# Altium PCB asar_feather.PcbDoc (part 3 of 4)
Units mm, origin at the board's own origin, x right, y up, seen from the top; angles counter-clockwise.
Board outline 50.8 x 22.86 mm, 6 copper layers (Top Layer, L2-GND, L3-SIG, L4-SIG, L5-VCC3V3, Bottom Layer), stack 1.568 mm thick; 174 components, 154 nets, 827 pads, 1521 vias.
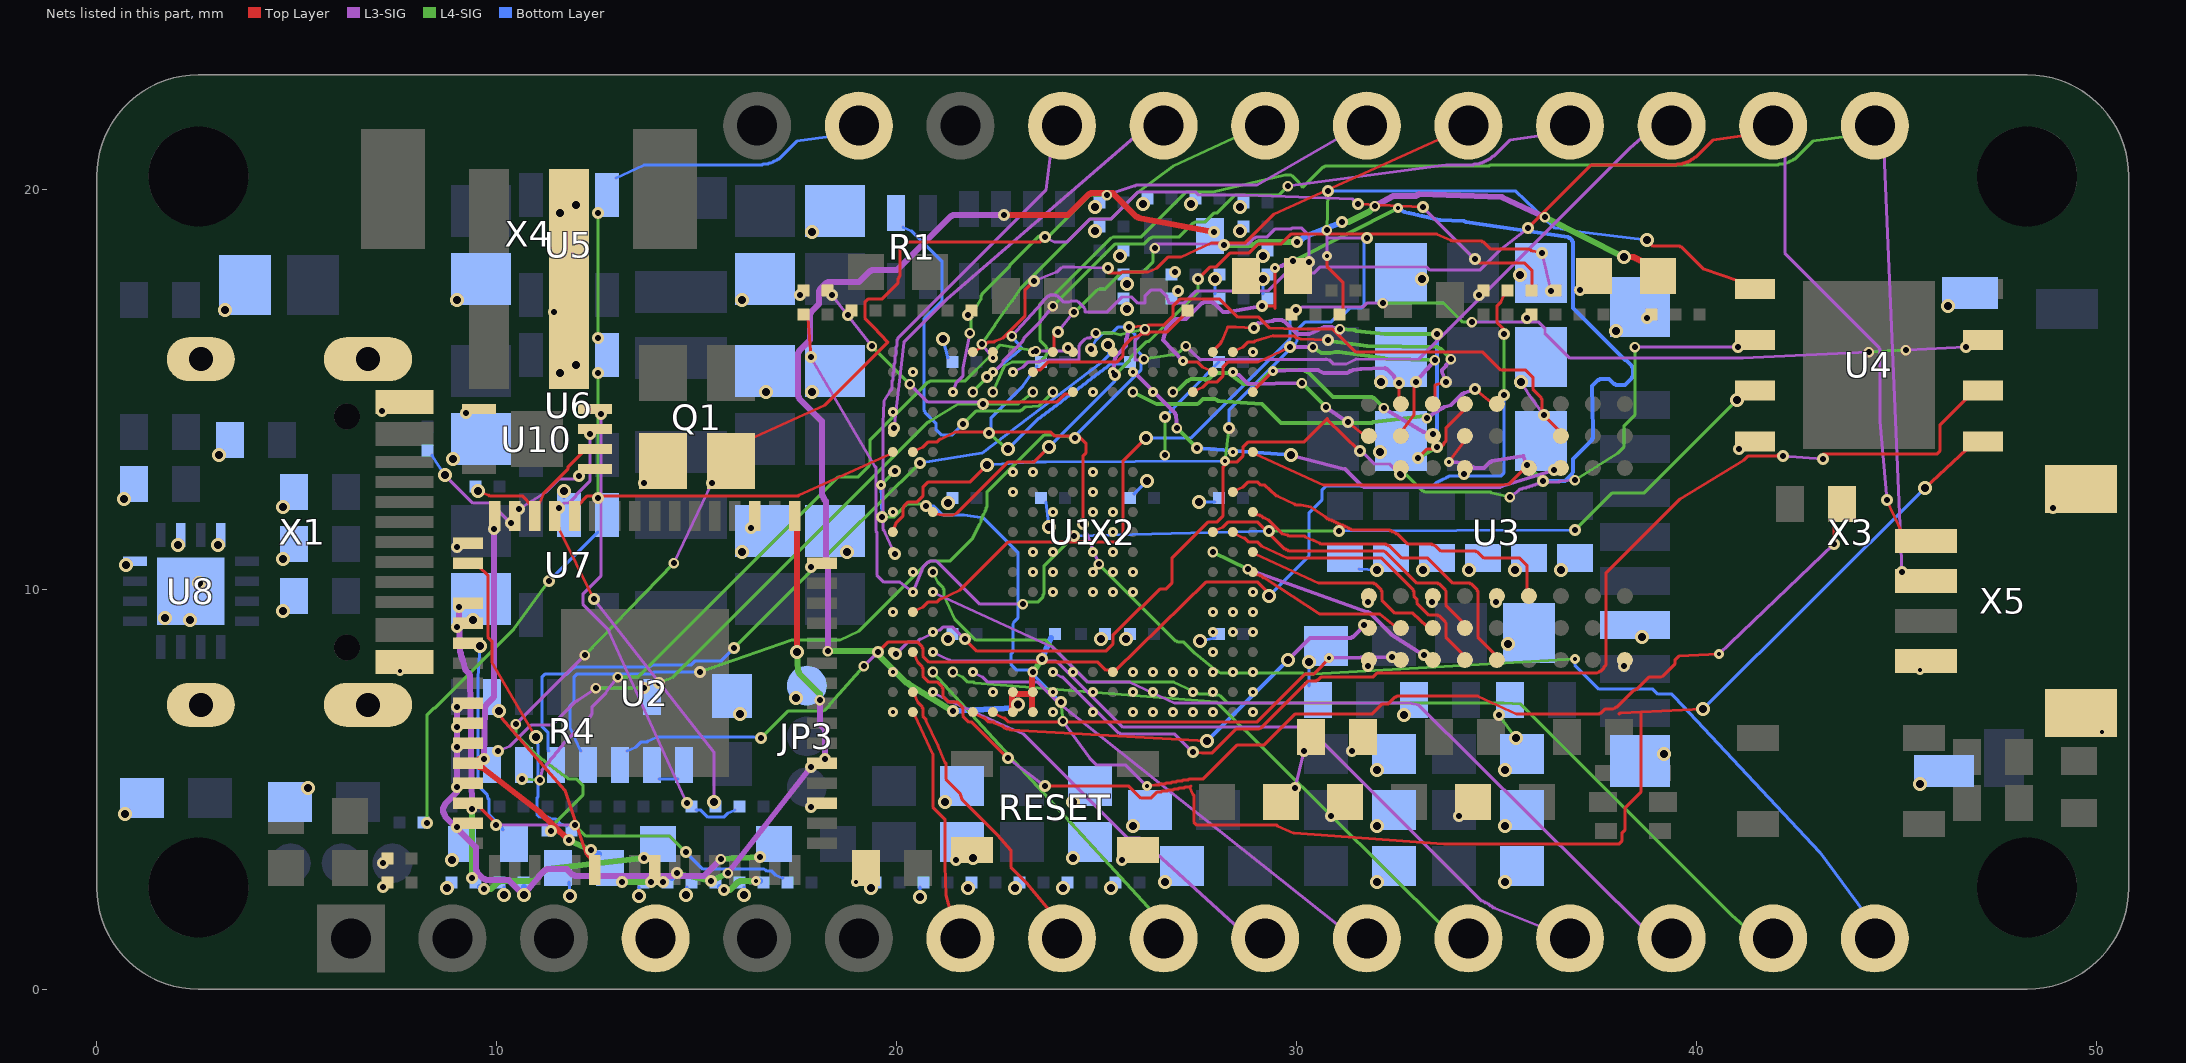
[diagram p6: the nets of this part, all layers, seen from the top]

## Via types
v1: diameter 0.27, hole 0.15, L3-SIG to L4-SIG, tented both sides, 233 vias
v2: diameter 0.3, hole 0.15, L5-VCC3V3 to Bottom Layer, tented both sides, 219 vias
v3: diameter 0.3, hole 0.15, Top Layer to L2-GND, tented both sides, 208 vias
v4: diameter 0.25, hole 0.1, Top Layer to L2-GND, tented both sides, 175 vias
v5: diameter 0.3, hole 0.15, L2-GND to L3-SIG, tented both sides, 171 vias
v6: diameter 0.3, hole 0.15, L4-SIG to L5-VCC3V3, tented both sides, 171 vias
v7: diameter 0.35, hole 0.2, Top Layer to Bottom Layer, tented both sides, 165 vias
v8: diameter 0.25, hole 0.1, L2-GND to L3-SIG, tented both sides, 106 vias
v9: diameter 0.25, hole 0.1, L4-SIG to L5-VCC3V3, tented both sides, 49 vias
v10: diameter 0.25, hole 0.1, L5-VCC3V3 to Bottom Layer, tented both sides, 24 vias

## Nets (pads, with @x,y where several pads share a name; then routed paths per layer and width w, separated by ;. In a path a pad name is that pad's centre, name@x,y a point inside that pad or via, vN(x,y) a via of type N, cw(c..) or ccw(c..) an arc to the next point about the centre after c; other vN are vias at no path point) (continued)
BS0: U1.V7 U3.G7 | length 11.8
  Top Layer w0.076: v3(36.425,12.975) U3.G7@36.45,12.975
  L3-SIG w0.1: v8@25.9,15.425 25.975,15.375 26.95,14.4 26.95,14.375 26.975,14.35 v1(27,14.025) ; v7(29.85,13.35) 31.2,13 31.625,12.575 31.65,12.575 31.675,12.55 35.075,12.55 35.1,12.575 35.125,12.575 v3(36.425,12.975)
  L4-SIG w0.1: v1(27,14.025) v6(27.5,13.525)
  Bottom Layer w0.1: v6(27.5,13.525) v7(29.85,13.35)
  other v2: 27.5,13.525
  other v4: 25.9,15.43
  other v5: 36.425,12.975
  other v8: 25.9,15.43
BS1: U1.V8 U3.G8 | length 14.2
  Top Layer w0.076: v3(25.8,16.55) 26.225,16.575 26.25,16.575 26.275,16.6 26.675,16.6 ; 26.67,16.595 26.9,16.825 26.9,17.075 27.075,17.25 28.075,17.25 28.525,16.8 29.05,16.8 29.325,16.525 30.025,16.5 30.9,16.5 31.475,15.925 34.65,15.925 35.1,15.475 35.725,15.475 35.9,15.3 35.9,15 36.1,14.8 36.1,14.775 36.125,14.75 36.125,14.4 U3.G8@36.55,13.975
  L3-SIG w0.1: v8@25.4,15.425 25.45,15.775 25.475,15.8 25.475,15.825 25.725,16.075 25.725,16.25 25.75,16.275 25.75,16.3 v3(25.8,16.55)
  other v4: 25.4,15.43
  other v5: 25.8,16.55
  other v8: 25.4,15.43
BTN: R85.2 U1.N19 | length 33.8
  Top Layer w0.076: v4(26.25,5.075) 26.45,5.1 26.55,5.1 26.575,5.125 26.7,5.125 26.725,5.15 26.85,5.15 26.875,5.175 26.975,5.175 27,5.2 27.125,5.2 27.15,5.225 27.275,5.225 27.3,5.25 27.65,5.25 28.5,6.1 29.175,6.1 29.95,6.875 31.875,6.875 32.125,7.125 32.275,7.125 32.45,7.3 32.475,7.3 32.5,7.325 34.525,7.325 35.5,6.875 37.55,6.875 37.575,6.9 37.6,6.9 37.7,7 37.9,7 37.95,7.025 37.975,7.05 38,7.05 38.425,7.475 38.45,7.475 38.475,7.5 38.5,7.5 38.8,7.8 39.1,7.8 39.15,7.825 39.45,8.125 39.45,8.225 39.55,8.325 v4(40.55,8.375) ; v3(43.425,11.125) R85.2@43.425,11.775
  L3-SIG w0.076: v1(24.15,6.7) 24.825,5.775 25,5.6 25.725,5.6 v4(26.25,5.075) ; v4(40.55,8.375) v3(43.425,11.125)
  L4-SIG w0.076: v9(19.6,12.6) v3(19.95,12.95) ; v6(19.625,11.8) 19.925,11.8 20.25,12.125 20.675,12.125 v6(20.725,12.075) ; v6(24.1,7.175) v1(24.15,6.7)
  Bottom Layer w0.076: v9(19.6,12.6) v6(19.625,11.8) ; v6(20.725,12.075) 20.925,12.075 21.15,11.85 21.675,11.85 22.175,11.775 23.025,10.925 23.025,9.275 22.925,9.175 22.9,9.125 22.9,8.425 22.85,8.375 22.85,8.125 23,7.975 23.3,7.975 v6(24.1,7.175)
  other v1: 19.95,12.95
  other v2: 24.1,7.175 19.625,11.8 20.725,12.075
  other v5: 43.425,11.125 19.95,12.95
  other v8: 26.25,5.075 40.55,8.375
  other v10: 19.6,12.6
CAS#: U1.P1 U3.F7 | length 7
  Top Layer w0.076: U1.P1@28.975,13.375 30.675,12.6 35.1,12.6 35.3,12.625 U3.F7@35.65,12.975
CFG-M0: R20.1 U1.V12 | length 4.4
  Top Layer w0.076: U1.V12@23.475,15.475 23.575,15.475 23.775,15.675 25.5,15.675 25.65,15.825 25.65,16.025 25.675,16.05 25.675,16.075 25.875,16.275 26.075,16.35 26.1,16.375 26.275,16.375 26.325,16.425 26.75,16.425 27.15,16.825 R20.1@27.15,16.85
CFG-M1: R21.2 U1.W11 | length 8.8
  Top Layer w0.076: U1.W11@23.925,16.025 23.925,16.375 v3(24.025,16.425)
  L3-SIG w0.076: v3(24.025,16.425) v1(24.425,16.925) ; v1(26.45,18.525) 26.45,18.625 28.775,18.625 28.925,18.775 28.95,18.775 28.975,18.8 29.25,18.8 29.45,19 29.85,19 29.875,19.025 30.125,19.025 30.3,18.85 v3(30.3,18.175)
  L4-SIG w0.076: v1(24.425,16.925) v1@24.5,16.975 ; v1@24.51,16.985 25,17.475 25.05,17.5 25.2,17.5 25.625,17.925 26.15,17.925 26.4,18.175 26.4,18.475 v1(26.45,18.525)
  other v5: 24.025,16.425 30.3,18.175
CFG-M2: R22.2 U1.U10 | length 7.3
  Top Layer w0.076: v3(22.15,14.625) 22.2,14.675 24,14.675 24.2,14.875 U1.U10@24.325,14.875
  L3-SIG w0.076: v3(18.375,17.35) v1(19.375,16.075) ; v1(20.325,15.125) 20.775,14.675 22.1,14.675 v3(22.15,14.625)
  L4-SIG w0.076: v1(19.375,16.075) v1(20.325,15.125)
  other v5: 22.15,14.625 18.375,17.35
CHAN0: U1.A18 X2.7 | length 5.2
  Top Layer w0.076: U1.A18@20.45,6.85 20.9,5.875 20.9,4.55 21.2,4.25 21.2,3.1 21.225,2.35 X2.7@21.35,1.9
CHAN1: U1.B18 X2.8 | length 6.7
  Top Layer w0.076: U1.B18@20.45,7.35 20.525,7.175 20.625,7.075 20.625,7.05 20.65,7.025 20.65,6.825 20.725,6.75 20.725,6.725 21.025,6.1 21.2,5.675 21.225,5.65 21.225,5.25 21.575,4.9 21.625,4.75 22.525,3.85 22.85,3.475 22.85,3.05 23.25,2.65 X2.8@23.875,1.9
CHAN2: U1.C17 X2.9 | length 8.2
  L4-SIG w0.076: v1@20.9,7.925 X2.9@26.425,1.9
  other v1: 20.9,7.93
  other v4: 20.9,7.93
  other v8: 20.9,7.93
CHAN3: U1.B17 X2.10 | length 9.9
  L3-SIG w0.076: v8@20.9,7.425 21.175,7.275 21.2,7.275 21.3,7.175 21.425,7.175 21.45,7.15 23.175,6.375 25.775,3.775 26.075,3.775 X2.10@28.575,1.5
  other v4: 20.9,7.43
  other v8: 20.9,7.43
CHAN4: U1.C15 X2.11 | length 11.5
  L3-SIG w0.076: v8@21.9,7.925 22.15,7.8 22.275,7.675 23.525,7.675 24.05,7.15 X2.11@31.125,1.525
  other v4: 21.9,7.93
  other v8: 21.9,7.93
CHAN5: U1.C16 X2.12 | length 14.7
  L4-SIG w0.076: v1@21.4,7.925 21.65,7.8 21.775,7.675 21.925,7.675 21.95,7.65 28,7.175 X2.12@33.675,1.55
  other v1: 21.4,7.93
  other v4: 21.4,7.93
  other v8: 21.4,7.93
CHAN6: U1.D17 X2.13 | length 18
  L3-SIG w0.076: v8@20.9,8.425 21.325,8.225 21.35,8.2 23.975,8.2 24.025,8.175 25.65,6.55 30.275,6.55 34.625,2.2 34.65,2.2 34.7,2.175 34.725,2.15 34.75,2.15 34.8,2.125 34.85,2.075 34.875,2.075 34.925,2.025 34.95,2.025 X2.13@36.2,1.525
  other v4: 20.9,8.43
  other v8: 20.9,8.43
CHAN7: U1.G17 X2.14 | length 20.9
  L3-SIG w0.076: v8@20.9,9.925 23.9,8.55 24.775,7.675 25.825,7.675 26.95,7.15 32.8,7.15 33.05,7.1 X2.14@38.725,1.475
  other v4: 20.9,9.93
  other v8: 20.9,9.93
CHAN8: U1.H17 X2.15 | length 24.3
  L4-SIG w0.076: v1@20.9,10.425 21.025,10.175 21.15,10.05 21.15,10.025 21.175,10 21.175,9.85 21.45,9.25 21.975,8.725 23.725,8.725 24.775,7.675 26.925,7.675 27.525,7.4 27.55,7.375 27.8,7.375 27.825,7.35 28.05,7.35 28.1,7.325 28.275,7.15 35.175,7.15 35.6,7.125 40.875,1.85 X2.15@41.275,1.5
  other v1: 20.9,10.43
  other v4: 20.9,10.43
  other v8: 20.9,10.43
CHAN14: U1.J19 X2.20 | length 11.8
  L3-SIG w0.076: v3(19.95,10.875) 19.7,11.425 19.675,11.475 19.65,11.5 19.65,14.15 19.675,14.7 19.85,14.975 19.875,15 19.875,15.2 19.9,15.225 19.9,15.4 19.925,15.425 19.925,15.625 19.95,15.65 19.95,15.825 19.975,15.85 19.975,16.05 20,16.075 20,16.225 20.025,16.25 20.025,16.275 23.725,19.975 X2.20@23.85,20.975
  other v5: 19.95,10.875
CHAN15: U1.R19 X2.21 | length 10
  L3-SIG w0.076: v3(19.925,14.025) 20.175,16.175 21.25,17.25 X2.21@26.025,21.375
  other v5: 19.925,14.025
CHAN16: U1.W14 X2.22 | length 9.1
  Top Layer w0.076: v4(22.4,15.775) U1.W14@22.4,15.85
  L3-SIG w0.076: v1(22.125,16.125) v4(22.4,15.775)
  L4-SIG w0.076: v1(22.125,16.125) 22.455,16.598 ; 22.45,16.6 22.875,17.2 ; 22.869,17.194 23.1,17.525 24.825,19.25 25.35,19.25 26.025,19.925 26.9,20.575 X2.22@28.575,21.35
  other v8: 22.4,15.775
CHAN17: U1.U16 X2.23 | length 13.1
  L3-SIG w0.076: v8@21.4,14.925 21.475,15.15 21.65,15.325 21.65,15.525 v1(21.825,16.4) ; v1(25.25,19.85) 25.925,20.075 25.95,20.075 25.975,20.1 29,20.1 X2.23@31.125,21.325
  L4-SIG w0.076: v1(21.825,16.4) 21.85,16.425 21.85,16.775 21.875,16.8 21.875,16.825 21.903,16.853 ; 21.9,16.85 22,17.075 22.1,17.25 ; 22.1,17.246 22.1,17.325 22.125,17.35 22.125,17.375 22.825,18.075 22.825,18.1 23.55,18.825 23.575,18.825 23.6,18.85 23.825,18.85 24.825,19.85 v1(25.25,19.85)
  other v4: 21.4,14.93
  other v8: 21.4,14.93
CHAN18: U1.W15 X2.24 | length 13.9
  Top Layer w0.076: U1.W15@21.975,15.975 22.15,16.05 22.275,16.175 22.425,16.175 22.45,16.2 22.65,16.275 23.2,16.825 23.2,17.475 v3(23.425,17.7) ; v3(25.275,18.025) 25.275,17.9 25.6,17.9 25.625,17.925 26.275,17.925 26.5,18.025 26.775,18.3 27.1,18.3 27.85,18.65 28.7,18.65 29.425,19.375 X2.24@33.675,21.3
  L3-SIG w0.076: v3(23.425,17.7) 23.975,17.925 24,17.925 24.1,18.025 24.15,18.05 24.425,18.05 v3(25.275,18.025)
  other v5: 23.425,17.7 25.275,18.025
CHAN19: U1.V14 X2.25 | length 16.1
  L3-SIG w0.076: v8@22.4,15.425 22.475,15.475 22.625,15.625 22.65,15.675 22.65,15.7 23.15,16.2 23.15,16.225 23.175,16.25 23.175,16.275 23.575,16.675 v1(23.9,17.075) ; v1(29.775,20.075) 33.725,20.6 34.4,20.6 34.425,20.625 34.55,20.625 34.575,20.65 34.625,20.65 34.65,20.675 34.675,20.675 34.7,20.7 34.725,20.7 34.75,20.725 34.775,20.725 34.8,20.75 34.825,20.75 34.9,20.825 34.925,20.825 35.325,21.225 X2.25@36.2,21.35
  L4-SIG w0.076: v1(23.9,17.075) 25.45,18.625 26.175,18.625 26.325,18.775 26.35,18.775 26.375,18.8 27.05,18.8 27.4,19.15 27.425,19.15 27.45,19.175 27.7,19.175 27.925,19.4 28,19.4 28.45,19.85 29.55,19.85 v1(29.775,20.075)
  other v4: 22.4,15.43
  other v8: 22.4,15.43
CHAN20: U1.V13 X2.26 | length 20.2
  L3-SIG w0.076: v8@22.9,15.425 23.15,15.55 23.272,15.672 ; 23.275,15.675 23.55,15.675 23.575,15.7 23.6,15.7 23.8,15.725 ; 23.791,15.726 24.55,15.728 ; 24.55,15.725 24.55,16.075 24.575,16.1 24.575,16.125 24.7,16.25 24.75,16.275 24.801,16.275 24.825,16.275 24.85,16.3 v1(24.975,16.4) ; 25.95,15.725 25.95,16.206 ; 25.95,15.731 v1@26.106,15.732 ; 25.95,16.2 v1(26.2,16.5) ; v1@26.1,15.725 v1(26.175,15.75) ; v1(27.225,16.075) 27.6,15.725 ; 27.598,15.736 30.732,15.744 ; 30.725,15.75 30.8,15.725 30.825,15.725 30.925,15.625 31.225,15.625 31.475,15.75 ; 31.469,15.746 33.05,15.75 38.325,21.025 X2.26@38.725,21.375
  L4-SIG w0.076: v1(24.975,16.4) 25.4,16.4 25.6,16.35 ; 25.602,16.362 v1(26.2,16.5) ; v1(26.175,15.75) 27,15.875 v1(27.225,16.075)
  other v4: 22.9,15.43
  other v8: 22.9,15.43
CHAN21: U1.U15 X2.27 X5.4 | length 34.1
  Top Layer w0.076: v3(35.775,19.025) 37.35,20.6 39.475,20.6 39.5,20.625 39.625,20.625 39.65,20.65 39.7,20.65 39.725,20.675 39.775,20.675 39.8,20.7 39.825,20.7 39.875,20.75 39.9,20.75 39.95,20.8 39.975,20.8 40.4,21.225 X2.27@41.275,21.35 ; v3(44.75,12.225) X5.4@45.125,11.425
  L3-SIG w0.076: v1(22.875,16.325) 23.625,17.15 23.65,17.175 23.65,17.2 23.775,17.325 23.8,17.325 23.825,17.35 23.975,17.35 24,17.325 24.025,17.325 24.175,17.175 24.3,17.175 24.35,17.2 24.5,17.2 24.55,17.175 24.675,17.05 24.7,17 24.7,16.925 ; 24.699,16.925 25.25,16.925 25.625,17.3 25.875,17.3 26.025,17.15 26.188,17.15 ; 26.2,17.15 26.2,17.325 26.35,17.475 26.6,17.475 26.75,17.325 26.75,17.275 26.775,17.25 26.8,17.15 ; 26.812,17.15 27.175,17.15 27.475,17.45 29.275,17.45 29.725,17.9 30.425,17.9 30.575,18.05 33.25,18.05 33.325,17.975 34.575,17.975 35.1,18.5 v3(35.775,19.025) ; X2.27@42.2,20.975 42.2,18.4 44.55,16.05 44.55,16.025 44.575,16 44.575,14.2 v3(44.75,12.225)
  L4-SIG w0.076: v1@21.9,14.925 v6(22.25,15.3)
  Bottom Layer w0.076: v6(22.25,15.3) 23.129,16.021 ; v1(22.875,16.325) 23.125,16.025
  other v1: 21.9,14.93
  other v2: 22.25,15.3
  other v4: 21.9,14.93
  other v5: 44.75,12.225 35.775,19.025
  other v8: 21.9,14.93
  other v9: 22.875,16.325
  other v10: 22.875,16.325
CHAN22: U1.U14 X2.28 X5.3 | length 35.8
  L3-SIG w0.076: X2.28@44.675,20.95 v3(45.125,10.425)
  L4-SIG w0.076: v1@22.4,14.925 22.678,15.567 ; 22.675,15.575 22.875,15.675 23.55,15.675 23.575,15.7 23.6,15.7 23.725,15.825 23.725,15.85 23.75,15.875 23.75,16.025 23.725,16.05 23.725,16.075 23.575,16.225 23.575,17.125 23.775,17.325 23.8,17.325 23.825,17.35 23.925,17.35 25.35,18.775 25.4,18.8 26.1,18.8 27.225,19.925 27.9,19.925 29.7,20.35 29.85,20.35 29.9,20.325 30.025,20.2 30.15,20.05 30.65,20.55 30.675,20.55 30.7,20.575 34.8,20.575 34.825,20.6 42.025,20.6 42.05,20.625 42.175,20.625 42.2,20.65 42.25,20.65 42.3,20.675 42.325,20.7 42.35,20.7 42.4,20.725 42.425,20.75 42.45,20.75 42.9,21.2 X2.28@43.825,21.325
  other v1: 22.4,14.93
  other v4: 22.4,14.93
  other v5: 45.125,10.425
  other v8: 22.4,14.93
CHAN-CLK: U1.P18 X2.16 | length 30.8
  Top Layer w0.076: U1.P18@20.475,13.475 20.65,13.55 20.775,13.675 21,13.675 21.075,13.75 21.1,13.75 21.45,13.925 23.85,13.925 23.95,13.825 24.55,13.825 24.725,13.65 24.725,13.4 24.65,13.325 v3(24.65,11.625)
  L3-SIG w0.076: v3(24.65,11.625) v1(25.05,10.625)
  L4-SIG w0.076: v1(25.05,10.625) 26.975,8.7 27,8.7 27.025,8.675 27.175,8.675 27.45,8.4 28,7.95 28.025,7.95 28.05,7.925 28.1,7.9 30.15,7.9 30.175,7.875 30.425,7.875 v9(36.95,8.25)
  Bottom Layer w0.076: v9(36.95,8.25) 36.95,8.1 37.55,7.5 38.9,7.5 39.025,7.375 39.375,7.375 39.45,7.3 43.075,3.425 X2.16@44.2,1.9
  other v5: 24.65,11.625
  other v10: 36.95,8.25
CKE: U1.M2 U3.F3 | length 8.7
  Top Layer w0.076: U1.M2@28.475,12.475 28.65,12.55 28.775,12.675 29.025,12.675 29.1,12.6 29.2,12.6 29.475,12.35 29.5,12.325 29.525,12.325 29.95,12.125 29.975,12.1 30.1,12.1 30.35,12.05 30.725,11.8 ; 30.72,11.79 30.75,11.775 30.775,11.75 30.8,11.75 30.825,11.725 30.875,11.725 30.9,11.7 30.925,11.7 30.95,11.675 30.975,11.675 31,11.65 31.025,11.65 31.05,11.625 31.075,11.625 31.1,11.6 31.15,11.6 31.2,11.575 31.225,11.55 31.25,11.55 31.3,11.525 31.325,11.5 31.35,11.5 31.375,11.475 32.325,11.475 32.35,11.45 32.375,11.45 32.4,11.425 32.425,11.425 32.475,11.4 32.5,11.375 32.525,11.375 32.775,11.125 33.375,11.125 33.4,11.1 33.425,11.1 33.475,11.075 33.6,10.95 34.475,10.95 34.5,10.925 34.525,10.925 34.675,10.775 35.575,10.775 35.75,10.6 U3.F3@35.75,9.975
CLK-12M-FPGA: R25.2 U1.L17 | length 19.5
  Top Layer w0.076: U1.L17@20.975,11.875 21.15,11.85 21.4,11.85 21.5,11.9 22.775,13.175 23.425,13.175 v7(23.8,13.55) ; v1(27.525,17.75) 27.825,18.05 27.975,18.05 28.325,18.4 28.8,18.4 29.025,18.625 29.6,18.625 29.85,18.875 33.5,18.875 33.85,18.725 33.875,18.7 34.625,18.7 34.65,18.675 34.675,18.675 34.85,18.5 35.8,18.5 35.85,18.475 35.875,18.45 35.9,18.45 v3(36.125,18.4)
  L3-SIG w0.076: v3(36.125,18.4) v3(36.35,17.45)
  L4-SIG w0.076: v6(25.45,15.35) 25.81,15.71 ; 25.8,15.7 25.85,15.8 26.225,16.175 26.3,16.2 ; 26.29,16.19 27.525,17.425 v1(27.525,17.75)
  Bottom Layer w0.076: v7(23.8,13.55) 25.45,15.2 v6(25.45,15.35)
  other v2: 25.45,15.35
  other v3: 27.525,17.75
  other v5: 36.35,17.45 27.525,17.75 36.125,18.4
CLK-12M-FT: R24.2 U2.2 | length 7.5
  Top Layer w0.076: U2.2@9.55,10.55 9.7,10.425 9.775,10.35 9.775,8.8 9.875,8.7 9.875,8.175 v7(10.975,6.3)
  Bottom Layer w0.076: v7(10.975,6.3) 11.025,6.1 11.025,4.8 11,4.775 11,4.375 11.075,4.3 11.275,4.3 11.3,4.275 11.325,4.275 11.35,4.25 11.475,4.25 11.575,4.15 R24.2@11.75,4.075
CLK-12M-SHARED: Q1.3 R24.1 R25.1 | length 36.8
  Top Layer w0.076: Q1.3@16.325,13.75 18.2,14.6 19.775,16.175 19.425,16.55 19.2,16.775 19.2,17.175 19.275,17.25 19.625,17.25 20.025,17.65 20.025,17.75 20.05,17.775 20.05,17.8 20.075,17.825 20.075,18.475 20.1,18.5 20.1,18.525 20.225,18.65 20.25,18.65 20.275,18.675 23.575,18.675 v3(23.7,18.8) ; v3(31.525,19.625) v3(33.15,19.55) ; v3(34.45,18.25) 34.55,18.15 35.7,18.15 35.875,17.975 R25.1@35.875,17.575
  L3-SIG w0.076: v1(10.475,6.625) v1(12.2,8.35) ; v1(14.425,10.65) v3(15.375,12.65) ; v3(23.7,18.8) 23.95,18.675 ; 23.941,18.675 24.25,18.675 24.825,19.25 25.35,19.25 26.025,19.925 27.475,19.925 27.55,19.85 28.7,19.85 31.4,19.75 v3(31.525,19.625) ; v3(33.15,19.55) v3(34.45,18.25)
  L4-SIG w0.076: v1(10.475,6.625) 10.475,6.375 11.05,5.8 11.075,5.8 11.15,5.725 11.175,5.725 11.25,5.65 11.275,5.65 11.35,5.575 11.375,5.575 11.45,5.5 11.475,5.5 11.55,5.425 11.575,5.425 11.65,5.35 11.675,5.35 11.725,5.3 11.75,5.3 11.8,5.25 12,5.25 12.15,5.1 12.15,4.85 11.375,4.075 v6(11.35,3.95) ; v1(12.2,8.35) v1(14.425,10.65)
  other v2: 11.35,3.95
  other v5: 15.375,12.65 34.45,18.25 23.7,18.8 33.15,19.55 31.525,19.625
D0: U1.V2 U3.A8 | length 3.8
  Top Layer w0.076: v3(31.275,14.175) U3.A8@31.65,13.875
  L3-SIG w0.1: v8@28.4,15.425 28.55,15.35 28.75,15.15 28.8,15.125 v1(30.125,15.15) ; v1(30.725,14.55) v3(31.275,14.175)
  L4-SIG w0.1: v1(30.125,15.15) v1(30.725,14.55)
  other v4: 28.4,15.43
  other v5: 31.275,14.175
  other v8: 28.4,15.43
D1: U1.U1 U3.B9 | length 4.4
  Top Layer w0.076: U1.U1@28.95,15 v4(29.4,15.45) ; U3.B9@32.55,14.775 v3(32.55,15.15)
  L3-SIG w0.1: v4(29.4,15.45) 30.05,15.475 30.517,15.486 ; 30.525,15.475 30.675,15.4 31.25,15.4 31.3,15.425 31.325,15.45 31.35,15.45 31.4,15.475 31.6,15.5 ; 31.59,15.511 32.2,15.525 32.225,15.5 32.25,15.5 32.425,15.325 32.425,15.3 32.45,15.275 v3(32.55,15.15)
  other v5: 32.55,15.15
  other v8: 29.4,15.45
D2: U1.U4 U3.B8 | length 8.6
  Top Layer w0.076: U1.U4@27.475,14.975 27.65,15.05 27.775,15.175 28,15.175 28.15,15.325 28.15,15.55 28.275,15.675 29.025,15.675 v3(29.825,16.05) ; U3.B8@32.65,13.975 32.925,14.35 32.925,15.125 v3(32.975,15.175)
  L3-SIG w0.1: v3(29.825,16.05) 30.203,16.05 ; 30.2,16.05 v1(30.4,16.05) ; v3(32.975,15.175) 33.25,15.5 ; 33.259,15.504 v1(33.45,15.725)
  L4-SIG w0.1: v1(30.4,16.05) 30.625,15.9 30.825,15.9 30.975,15.925 ; 30.965,15.936 31.05,15.925 31.225,15.9 31.425,15.875 31.6,15.85 31.8,15.825 31.975,15.8 32.175,15.775 32.25,15.75 v1(33.45,15.725)
  other v5: 32.975,15.175 29.825,16.05
D3: U1.W2 U3.C9 | length 6.9
  Top Layer w0.076: U1.W2@28.475,15.975 28.65,16.05 28.775,16.175 28.925,16.175 28.95,16.2 29.399,16.337 ; 29.4,16.325 29.95,16.325 29.975,16.3 ; 29.97,16.305 30,16.275 30.025,16.275 30.1,16.25 v1(30.775,16.225) ; U3.C9@33.45,14.775 33.45,15.1 v3(33.725,15.175)
  L3-SIG w0.1: 33.625,15.475 33.625,15.45 v3(33.725,15.175) ; 33.629,15.479 33.725,15.575 33.725,15.6 33.75,15.625 v1(33.85,15.75)
  L4-SIG w0.1: v1(30.775,16.225) v1@30.8,16.225 ; v1@30.795,16.23 30.825,16.2 31,16.175 31.2,16.15 31.375,16.125 31.575,16.1 31.75,16.075 33.5,16.05 33.55,16.025 33.6,16 v1(33.85,15.75)
  other v3: 30.775,16.225
  other v5: 33.725,15.175 30.775,16.225
D4: U1.U5 U3.C8 | length 7.5
  L3-SIG w0.1: v1(32.175,14.525) 33.175,13.925 v3(33.4,13.875)
  L4-SIG w0.1: v1@26.9,14.925 27.05,15 27.25,15.2 27.275,15.2 27.3,15.225 27.35,15.25 27.7,15.25 27.721,15.229 ; 27.725,15.225 27.775,15.25 27.8,15.25 27.9,15.35 27.925,15.35 27.95,15.375 27.975,15.375 28,15.4 28.3,15.4 28.675,15.125 ; 28.68,15.125 29,15.125 29.05,15.15 29.375,15.475 30.175,15.475 30.2,15.45 30.225,15.45 30.25,15.425 30.275,15.425 30.9,14.8 31.875,14.8 31.9,14.775 31.925,14.775 v1(32.175,14.525)
  other v1: 26.9,14.93
  other v4: 26.9,14.93
  other v5: 33.4,13.875
  other v8: 26.9,14.93
D5: U1.W3 U3.D9 | length 11.6
  Top Layer w0.076: U1.W3@27.95,16 28.1,16.15 28.1,16.175 28.125,16.2 28.15,16.25 28.275,16.55 ; 28.271,16.55 28.475,16.55 v3(28.925,16.525) ; v3(33.025,13.275) 33.25,13.5 33.5,13.5 33.55,13.525 33.575,13.55 33.6,13.55 33.675,13.625 33.675,13.65 33.725,13.7 33.725,14.025 U3.D9@34.175,14.475
  L3-SIG w0.1: v3(28.925,16.525) 29.025,16.65 ; v5@29.019,16.641 29.375,16.7 29.4,16.7 29.425,16.725 29.625,16.725 29.65,16.7 29.675,16.7 30,16.375 30.307,16.375 ; 30.3,16.375 30.525,16.475 30.55,16.5 30.625,16.525 30.65,16.525 30.675,16.55 30.875,16.55 30.9,16.525 30.925,16.525 v1@31.075,16.375 ; v1@31.025,16.425 31.075,16.475 v1(31.075,16.5)
  L4-SIG w0.1: v1(31.075,16.5) 31.425,16.475 31.45,16.475 31.475,16.45 32.2,16.375 v6(33.5,16.375) ; v3(33.025,13.275) v6(33.5,13.55)
  Bottom Layer w0.1: v6(33.5,13.55) v6(33.5,16.375)
  other v1: 33.025,13.275
  other v2: 33.5,13.55 33.5,16.375
  other v5: 33.025,13.275 28.925,16.525
D6: U1.V3 U3.D8 | length 25.8
  Top Layer w0.076: v4@27.099,15.675 27.525,15.675 27.65,15.55 U1.V3@27.825,15.475 ; v4@27.15,15.675 v4(27.15,15.7) ; v3(29.125,17.075) 29.45,17.075 ; 29.45,17.012 v4(29.45,18.025) ; v4(33.8,13.175) U3.D8@34.175,13.675
  L3-SIG w0.1: v4(27.15,15.7) 26.65,16.225 26.725,16.5 26.75,16.525 26.75,16.55 26.925,16.725 26.95,16.725 26.975,16.75 27.225,16.75 27.625,17.15 27.65,17.15 27.675,17.175 27.875,17.175 27.9,17.15 27.925,17.15 28.15,16.925 28.275,16.925 v3(29.125,17.075) ; v4(29.45,18.025) 29.6,18.075 29.625,18.075 29.65,18.1 29.675,18.1 29.7,18.125 v1(29.9,18.2) ; v4(33.8,13.175) 34.25,13.15 34.275,13.15 34.375,13.05 34.4,13.05 34.425,13.025 34.675,13.025 34.825,13.175 34.85,13.175 34.875,13.2 35.65,13.325 ; 35.663,13.33 v1(35.75,13.1)
  L4-SIG w0.1: v1(29.9,18.2) v9(32.525,19.525) ; v1(35.75,13.1) v6(36.15,12.7)
  Bottom Layer w0.1: v9(32.525,19.525) 32.7,19.425 32.8,19.4 32.925,19.375 33.025,19.35 33.125,19.325 33.25,19.3 33.35,19.275 33.45,19.25 33.575,19.225 34.175,19.2 34.225,19.175 36.775,18.8 36.8,18.775 36.825,18.775 36.875,18.725 36.875,18.7 36.9,18.675 36.9,17.025 38.2,15.725 38.225,15.725 38.375,15.575 38.375,15.55 38.4,15.525 38.4,15.325 38.375,15.3 38.375,15.275 38.2,15.1 37.975,15.1 37.95,15.125 37.925,15.125 37.8,15.25 37.575,15.25 37.55,15.225 37.525,15.225 37.375,15.075 37.4,13.975 37.4,13.775 37.375,13.75 37.375,13.725 36.9,13.25 36.9,12.925 36.875,12.875 36.7,12.7 v6(36.15,12.7)
  other v2: 36.15,12.7
  other v5: 29.125,17.075
  other v8: 33.8,13.175 27.15,15.7 29.45,18.025
  other v10: 32.525,19.525
D7: U1.U7 U3.E9 | length 9.8
  Top Layer w0.076: v3(34.45,15) U3.E9@34.85,14.675
  L3-SIG w0.1: v1(33.25,14.275) 33.5,14.45 33.525,14.45 33.575,14.5 33.6,14.5 33.625,14.525 33.65,14.525 33.675,14.55 33.85,14.6 34.125,14.875 34.15,14.875 34.175,14.9 v3(34.45,15)
  L4-SIG w0.1: v1@25.9,14.925 26.5,14.625 27.5,14.625 27.55,14.65 27.65,14.75 27.95,14.75 28,14.725 28.025,14.7 28.05,14.7 29.125,14.625 29.6,14.15 31.875,14.15 31.9,14.175 31.925,14.175 v1@33.293,14.343 ; v1(33.25,14.275) v1@33.25,14.325
  other v1: 25.9,14.93
  other v4: 25.9,14.93
  other v5: 34.45,15
  other v8: 25.9,14.93
D8: U1.L1 U3.E1 | length 8.1
  Top Layer w0.076: U1.L1@28.975,11.875 29,11.875 29.025,11.85 29.075,11.85 29.1,11.825 29.125,11.825 29.175,11.775 29.2,11.775 29.301,11.729 ; 29.3,11.725 29.65,11.375 29.75,11.35 29.775,11.35 29.8,11.325 30.2,11.325 30.225,11.3 30.4,11.225 ; 30.396,11.231 30.575,11.15 30.6,11.125 32.225,11.125 32.25,11.1 32.275,11.1 32.3,11.075 32.325,11.075 32.625,10.775 33.275,10.775 33.9,10.15 34.325,10.15 34.35,10.125 34.375,10.125 34.5,10 34.5,9.975 34.525,9.95 34.525,8.8 U3.E1@34.95,8.375
D9: U1.K3 U3.D2 | length 7.5
  Top Layer w0.076: U1.K3@27.975,11.475 28.15,11.55 28.275,11.675 29.025,11.675 29.7,11 29.725,11 29.75,10.975 29.775,10.975 29.8,10.95 32.175,10.95 32.225,10.925 33,10.15 33.525,10.15 33.55,10.125 33.575,10.125 33.7,10 33.725,9.95 33.725,9.6 U3.D2@34.15,9.175
D10: U1.K2 U3.D1 | length 7.2
  Top Layer w0.076: U1.K2@28.475,11.375 28.675,11.275 28.7,11.275 28.8,11.175 29.025,11.175 29.125,11.075 29.775,10.775 32.125,10.775 32.9,10 32.9,9.975 32.925,9.95 32.925,9.825 33,9.75 33,9.65 33.3,9.35 33.525,9.35 33.55,9.325 33.575,9.325 33.7,9.2 33.725,9.15 33.725,8.8 U3.D1@34.15,8.375
D11: U1.J1 U3.C2 | length 5
  Top Layer w0.076: U1.J1@28.975,10.875 30.55,10.15 31.925,10.15 31.95,10.125 31.975,10.125 32.1,10 32.1,9.975 32.125,9.95 32.125,9.725 32.45,9.4 32.9,9.4 U3.C2@33.25,9.075
D12: U1.J3 U3.C1 | length 6
  Top Layer w0.076: v3(33.175,8.35) U3.C1@33.25,8.275
  L3-SIG w0.1: v1(28.775,10.5) 31.775,9.425 31.8,9.4 31.825,9.4 32.35,8.875 v3(33.175,8.35)
  L4-SIG w0.1: v1@27.9,10.925 v1(28.775,10.5)
  other v1: 27.9,10.93
  other v4: 27.9,10.93
  other v5: 33.175,8.35
  other v8: 27.9,10.93
D13: U1.H1 U3.B2 | length 3.9
  Top Layer w0.076: U1.H1@28.975,10.375 29,10.375 29.025,10.35 29.075,10.35 29.1,10.325 29.125,10.325 29.175,10.275 29.2,10.275 30.575,9.375 32.075,9.375 U3.B2@32.45,9.075
D14: U1.A14 U3.B1 | length 10.7
  Top Layer w0.076: U1.A14@22.475,6.875 22.675,6.775 22.7,6.775 22.8,6.675 29,6.675 30.2,7.875 30.425,7.875 30.6,8.05 v4(30.8,8.275) ; v3(32.375,8.3) U3.B1@32.45,8.275
  L3-SIG w0.1: v4(30.8,8.275) v3(32.375,8.3)
  other v5: 32.375,8.3
  other v8: 30.8,8.275
D15: U1.A15 U3.A2 | length 11
  Top Layer w0.076: U1.A15@21.975,6.875 22.175,6.775 22.2,6.775 22.3,6.675 22.425,6.675 22.45,6.65 22.625,6.575 22.65,6.575 22.7,6.525 22.75,6.5 22.825,6.5 22.85,6.475 v7(27.75,6.2)
  L3-SIG w0.1: v7(29.775,8.225) 30.325,8.775 31.35,8.775 31.375,8.8 31.4,8.8 31.55,8.95 v3(31.675,9.1)
  Bottom Layer w0.1: v7(27.75,6.2) v7(29.775,8.225)
  other v5: 31.675,9.1
DONE: R4.2 U2.22 | length 4.4
  Top Layer w0.076: v7(10.05,6.95) 10.125,6.775 11.7,4.975 12.225,3.4 U2.22@12.35,3.25
DONE-PU: R4.9 R4.10 | length 0.5
  Bottom Layer w0.076: R4.10@14.05,5.25 R4.9@14.525,5.25
EE-CLK: R96.1 U2.62 U10.2 | length 3.2
  Top Layer w0.076: v7(9.525,12.45) 9.8,12.35 9.825,12.325 10.65,12.325 10.725,12.25 U2.62@10.85,12.1 ; U2.62@11.05,12.1 11.175,12.4 11.775,13 11.775,13.05 U10.2@12.125,13.4
EE-CS: R98.1 U2.63 U10.1 | length 4.6
  Top Layer w0.076: v3(12.05,12.825) U10.1@12.125,12.9
  L3-SIG w0.076: v7(8.7,12.85) 9.4,12.15 9.85,12.15 v3(10.35,11.65) ; v3(10.55,12) 11.225,12.425 11.55,12.75 11.975,12.75 v3(12.05,12.825)
  Bottom Layer w0.076: R98.1@8.375,13.35 v7(8.7,12.85)
  other v5: 10.35,11.65 10.55,12 12.05,12.825
EE-DATA: R101.2 U2.61 U10.3 | length 10.4
  Top Layer w0.076: U2.61@11.55,11.525 v3(12.425,9.75) ; v3(12.325,13.875) U10.3@12.325,13.9
  L3-SIG w0.076: v3(11.55,12.025) 11.675,12.15 11.8,12.15 11.975,12.325 11.975,12.35 12.325,12.7 v3(12.325,13.875) ; v3(12.425,9.75) 15.425,5.925 v7(15.425,4.675)
  other v5: 12.425,9.75 11.55,12.025 12.325,13.875
EE-DATA-DO: R97.1 R101.1 U10.4 | length 11.7
  Top Layer w0.076: v3(12.6,14.375) U10.4@12.6,14.4
  L3-SIG w0.076: v3(12.6,14.375) 12.6,10.325 12.15,9.875 12.15,9.625 12.8,8.975 12.8,8.95 v1(14.75,4.65)
  Bottom Layer w0.076: R101.1@14.975,4.475 15.1,4.475 15.275,4.3 15.675,4.3 15.775,4.4 R97.1@15.95,4.475
  other v2: 14.75,4.65
  other v5: 12.6,14.375
  other v6: 14.75,4.65
EN: R26.2 U5.3 U6.3 U7.3 X2.18 | length 21.1
  L4-SIG w0.076: v6(8.25,4.15) 8.25,6.85 8.425,7.025 8.45,7.025 10.425,9 v6(11.3,10.2) ; v6(12.525,12.275) v6(12.525,15.4) ; v6(12.525,16.275) v6(12.525,19.4)
  Bottom Layer w0.076: v6(11.3,10.2) U7.3@12.525,11.425 ; v6(12.525,15.4) U6.3@12.525,15.425 ; v6(12.525,19.4) U5.3@12.525,19.425 ; U5.3@12.975,20.275 13.675,20.6 16.625,20.6 16.65,20.625 16.775,20.625 16.8,20.65 16.85,20.65 16.9,20.675 16.925,20.7 16.95,20.7 17,20.725 17.025,20.75 17.05,20.75 17.5,21.2 X2.18@18.425,21.325
  other v2: 8.25,4.15 11.3,10.2 12.525,12.275 12.525,15.4 12.525,16.275 12.525,19.4
FLASH-CS#: R7.1 U1.K19 U4.1 | length 32
  Top Layer w0.076: U1.K19@19.925,11.525 19.975,11.65 20.15,11.825 20.15,12.025 20.175,12.05 20.175,12.075 20.275,12.175 20.5,12.175 20.65,12.325 20.65,12.55 20.775,12.675 21.825,12.675 v7(22.25,13.1) ; v4(30.75,18.325) 30.75,18.075 31.15,17.675 R7.1@31.15,16.975 ; v7(38.75,18.725) 38.9,18.575 39.575,18.575 39.6,18.55 39.625,18.55 40.175,18 U4.1@41.05,17.7
  L3-SIG w0.076: v4(30.75,18.325) v1(30.75,18.975) ; 30.75,18.775 v6(31.75,18.775)
  L4-SIG w0.076: v9(28.2,13.2) v6(28.3,14.025) ; v1(30.75,18.975) v6(30.775,19.95)
  Bottom Layer w0.076: v7(22.25,13.1) 23.375,13.175 23.725,13.175 v9(28.2,13.2) ; v6(28.3,14.025) 28.3,14.475 29.975,16.15 30,16.2 30,16.475 30.2,16.675 30.85,16.675 30.95,16.775 31.075,16.775 31.325,17.025 31.6,17.025 31.675,17.1 31.675,18.7 v6(31.75,18.775) ; v6(30.775,19.95) 35.475,19.95 36.425,19.05 36.45,19.025 36.6,19.025 36.625,19 36.775,19 36.8,18.975 36.85,18.975 36.875,18.95 36.9,18.95 v7(38.75,18.725)
  other v1: 31.75,18.775
  other v2: 28.3,14.025 31.75,18.775 30.775,19.95
  other v8: 30.75,18.325
  other v10: 28.2,13.2
FLASH-D00: U1.D18 U4.5 | length 35.4
  Top Layer w0.076: U1.D18@20.45,8.35 20.525,8.175 20.625,8.075 20.625,8.05 20.65,8.025 20.65,7.825 20.8,7.675 21.025,7.675 21.125,7.575 21.125,7.55 21.15,7.525 21.15,7.325 21.3,7.175 21.525,7.175 21.625,7.075 21.625,7.05 21.65,7.025 21.65,6.825 21.8,6.675 21.875,6.675 v3(22.775,5.775) ; v3(23.7,5.075) 25.8,5.075 26.1,4.775 26.35,4.775 26.5,4.925 26.6,4.925 26.625,4.95 26.75,4.95 26.775,4.975 26.9,4.975 26.925,5 27.025,5 27.05,5.025 27.175,5.025 27.2,5.05 27.325,5.05 ; 27.35,5.075 27.325,5.05 ; 38.05,6.875 38.075,6.9 38.1,6.9 v7(40.15,7) ; 38.6,6.925 38.6,4.925 38.2,4.525 38.2,3.975 38.125,3.9 38.125,3.7 38.05,3.625 33.675,3.625 29.925,3.9 29.525,4.075 29.5,4.1 27.5,4.1 27.425,4.175 27.425,4.85 27.4,4.875 27.325,5.05 ; v7(45.7,12.525) U4.5@46.75,13.5
  L3-SIG w0.076: v3(22.775,5.775) v3(23.7,5.075)
  Bottom Layer w0.076: v7(40.15,7) v7(45.7,12.525)
  other v5: 23.7,5.075 22.775,5.775
FLASH-D01: U1.D19 U4.2 | length 28.9
  Top Layer w0.076: v3(21.7,8.75) 22,8.45 25.225,8.45 25.4,8.625 25.4,8.85 26.075,9.525 26.1,9.525 26.575,10 26.725,10 26.875,10.15 26.875,10.775 27.775,11.675 28,11.675 28.15,11.825 28.15,13.05 28.275,13.175 28.5,13.175 28.65,13.325 28.65,13.55 28.775,13.675 30.175,13.675 30.772,14.272 ; 30.75,14.25 v3(31.575,13.45) ; v3(41.025,16.05) U4.2@41.05,16.05
  L3-SIG w0.076: v3(19.975,8.375) 20.275,8.675 20.5,8.675 20.575,8.75 20.6,8.75 21.05,8.975 21.075,8.975 21.15,9.05 21.4,9.05 v3(21.7,8.75) ; v3(31.575,13.45) 31.625,13.45 31.95,13.125 32.325,13.125 v1(32.6,12.85) ; v1(35.325,12.3) 35.55,12.475 35.575,12.5 35.625,12.5 35.65,12.525 35.725,12.525 35.75,12.55 35.8,12.55 35.825,12.575 35.875,12.575 35.9,12.6 35.95,12.6 35.975,12.625 36.05,12.625 36.075,12.65 36.125,12.65 36.15,12.675 36.55,12.675 36.575,12.7 36.6,12.7 v1(36.95,12.725) ; v1(38.45,16.05) v3(41.025,16.05)
  L4-SIG w0.076: v1(32.6,12.85) 32.75,12.85 33.15,12.45 33.175,12.45 33.2,12.425 34.85,12.425 34.875,12.4 v1(35.325,12.3) ; v1(36.95,12.725) 38.025,13.4 38.175,13.55 38.175,14.075 38.45,14.35 v1(38.45,16.05)
  other v5: 19.975,8.375 21.7,8.75 31.575,13.45 41.025,16.05
FLASH-D02: R2.1 U1.G18 U4.3 | length 32
  Top Layer w0.076: R2.1@17.775,16.775 v3(17.85,15.8) ; v7(41,14.725) U4.3@41.05,14.775
  L3-SIG w0.076: v3(17.85,15.8) 19.45,13.075 19.475,13.05 19.475,11.45 19.5,11.425 19.5,10.35 19.675,10.175 20.075,10.175 20.4,9.925 20.6,10.425 20.625,10.45 20.625,10.5 20.65,10.525 20.65,10.55 20.775,10.675 20.8,10.675 20.825,10.7 20.975,10.7 21.025,10.675 22.075,9.625 v1(23.15,9.625)
  L4-SIG w0.076: v1(23.15,9.625) 23.2,9.675 23.525,9.675 23.65,9.8 23.65,9.85 23.675,9.875 23.675,10.575 v6(24.425,11.325) ; v6(29.3,11.45) v6(31.05,11.45) ; v6(36.95,11.475) 37.875,12.4 38.675,12.4 v7(41,14.725)
  Bottom Layer w0.076: v6(24.425,11.325) v6(29.3,11.45) ; v6(31.05,11.45) v6(36.95,11.475)
  other v2: 24.425,11.325 29.3,11.45 31.05,11.45 36.95,11.475
  other v4: 20.4,9.93
  other v5: 17.85,15.8
  other v8: 20.4,9.93
FLASH-D03: R6.1 U1.F18 U4.7 | length 31.5
  Top Layer w0.076: U1.F18@20.475,9.475 20.65,9.55 20.775,9.675 21,9.675 21.075,9.75 21.1,9.75 21.575,9.975 22.775,11.175 25.5,11.175 25.65,11.325 25.65,13.2 v7(26.225,13.775) ; v3(46.725,16.05) U4.7@46.75,16.05
  L3-SIG w0.076: v3(29.975,16.975) 30.125,17.05 31.65,17.05 31.75,17.15 v1(32.15,17.15) ; v1(34.375,16.675) 36.05,16.675 36.2,16.525 36.2,16.4 36.825,15.775 41.15,15.775 v1@44.306,15.931 ; v1(45.225,15.975) v1@45.25,15.975 ; v1@45.258,15.978 v3(46.725,16.05)
  L4-SIG w0.076: v1(32.15,17.15) 33.675,17.15 34.15,16.675 v1(34.375,16.675) ; v1(44.3,15.925) v1(45.225,15.975)
  Bottom Layer w0.076: v7(26.225,13.775) 27.35,13.775 29.825,16.25 29.825,16.825 v3(29.975,16.975)
  other v1: 29.975,16.975
  other v2: 29.975,16.975
  other v5: 46.725,16.05 29.975,16.975
  other v6: 29.975,16.975
FPGA-CCLK: U1.C11 U4.6 | length 29.1
  Top Layer w0.076: v3(27.4,5.925) 27.625,5.9 27.875,5.9 28.475,6.5 29.05,6.5 29.1,6.525 30.275,7.7 30.475,7.7 30.5,7.725 30.525,7.725 30.6,7.8 31.9,7.8 32,7.9 37.5,7.9 37.55,7.925 37.575,7.95 37.6,7.95 37.675,8.025 37.675,8.05 37.725,8.1 37.725,10.4 39.575,12.25 41.175,13.225 41.275,13.325 42,13.325 42.05,13.375 42.075,13.375 v3(42.15,13.325) ; v3(43.15,13.25) v3@43.15,13.375 ; v3@43.16,13.375 46,13.375 46.075,13.45 46.075,14.1 U4.6@46.75,14.775
  L3-SIG w0.076: v8@23.9,7.925 24.125,7.8 24.15,7.8 25.55,6.4 25.575,6.4 25.6,6.375 26.95,6.375 v3(27.4,5.925) ; v3(42.15,13.325) v3(43.15,13.25)
  other v4: 23.9,7.93
  other v5: 27.4,5.925 43.15,13.25 42.15,13.325
  other v8: 23.9,7.93
FPGA-DONE: R4.7 R4.15 U1.U12 | length 16.5
  L3-SIG w0.076: v1(10.025,5.95) 10.325,6.075 10.85,6.6 11.375,6.6 11.975,7.2 12,7.2 12.025,7.225 v1(12.475,7.525)
  L4-SIG w0.076: v1(12.475,7.525) v6(13.675,7.525) ; v6(14.05,7.65) 14.4,7.8 20.775,14.175 20.8,14.175 20.825,14.2 21.525,14.625 23.025,14.625 v1@23.4,14.925
  Bottom Layer w0.076: v6(13.675,7.525) R4.7@13.7,7.525
  other v1: 23.4,14.93
  other v2: 10.025,5.95 13.675,7.525 14.05,7.65
  other v4: 23.4,14.93
  other v6: 10.025,5.95
  other v8: 23.4,14.93
FPGA-INIT#: R1.1 U1.U11 | length 9.2
  L4-SIG w0.076: v6(21.65,14.125) 21.975,14.45 23.075,14.45 23.1,14.475 23.125,14.475 23.2,14.55 23.225,14.55 23.55,14.575 v1@23.9,14.925
  Bottom Layer w0.076: R1.1@20.15,19.05 20.375,18.95 21.125,18.2 21.125,17.2 20.675,16.75 20.675,14.475 20.7,14.45 20.7,14.425 20.975,14.15 20.975,14 21.125,13.85 21.375,13.85 v6(21.65,14.125)
  other v1: 23.9,14.93
  other v2: 21.65,14.125
  other v4: 23.9,14.93
  other v8: 23.9,14.93
FPGA-TCK: R4.11 R5.2 U1.C8 | length 31
  Top Layer w0.076: v3(19.525,8.425) 19.775,8.675 20.525,8.675 20.625,8.575 20.625,8.55 20.65,8.525 20.65,8.325 20.8,8.175 25.025,8.175 25.225,7.975 U1.C8@25.325,7.975 ; U1.C8@25.475,7.975 27.725,10.175 29.025,10.175 29.3,9.9 v7(29.3,9.825) ; v1(35.175,16.375) 35.175,16.5 35,16.675 35,17.075 35.1,17.175 R5.2@35.175,17.35
  L3-SIG w0.076: v1(19.175,8.075) v3(19.525,8.425)
  L4-SIG w0.076: v6(16.6,6.275) 17.275,6.95 18.15,6.95 18.2,6.975 18.325,7.1 18.325,7.125 18.35,7.15 v1(19.175,8.075) ; v6(35.175,14.85) v1(35.175,16.375)
  Bottom Layer w0.076: R4.11@13.25,5.95 13.475,6.05 13.6,6.175 13.75,6.175 13.775,6.2 14,6.3 16.425,6.3 v6(16.6,6.275) ; v7(29.3,9.825) 30.3,10.825 30.3,11.9 30.625,12.225 30.625,12.475 30.725,12.575 33.375,12.575 33.4,12.6 33.425,12.6 33.5,12.675 33.525,12.675 33.55,12.7 33.575,12.7 33.6,12.725 33.625,12.725 33.65,12.75 33.675,12.75 33.725,12.775 33.75,12.8 33.775,12.8 33.8,12.825 35.1,12.825 35.175,12.9 v6(35.175,14.85)
  other v2: 16.6,6.275 35.175,14.85
  other v3: 35.175,16.375
  other v5: 19.525,8.425 35.175,16.375
FPGA-TDI: R4.14 U1.W10 | length 19
  Top Layer w0.076: v3(24.275,16.025) U1.W10@24.325,15.975
  L3-SIG w0.076: v1(11.075,5.225) 11.125,5.45 11.125,5.475 11.225,5.575 11.225,5.6 11.325,5.7 11.325,5.725 11.45,5.85 11.45,5.875 11.55,5.975 11.55,6 11.65,6.1 11.65,6.125 12.35,6.825 12.35,6.85 12.375,6.875 12.375,7.05 12.725,7.4 12.75,7.45 v1(13.025,7.8) ; v1@23.471,15.95 24.2,15.95 v3(24.275,16.025)
  L4-SIG w0.076: v6(10.625,5.25) v1(11.075,5.225) ; v1(13.025,7.8) 13.525,7.8 18.525,12.8 19.025,12.8 19.3,13.075 19.3,13.1 19.325,13.125 19.325,13.725 20.775,15.175 20.8,15.175 20.825,15.2 21.7,15.2 22.317,15.817 ; 22.325,15.825 22.575,16.1 v1(23.475,15.95)
  other v2: 10.625,5.25
  other v5: 24.275,16.025
FPGA-TDO: R4.13 U1.W8 | length 19.5
  Top Layer w0.076: v7(25.275,16.1) U1.W8@25.35,16
  L4-SIG w0.076: v6(15.925,8.525) 18.625,11.225 v6(20.575,13.15)
  Bottom Layer w0.076: R4.13@11.3,5.95 11.275,5.975 11.275,6.425 11.125,6.575 11.125,7.8 11.2,7.875 11.75,7.875 11.9,8.025 11.925,8.025 11.95,8.05 13.8,8.05 13.825,8.075 13.85,8.075 13.875,8.1 14.85,8.1 14.95,8.2 15.6,8.2 v6(15.925,8.525) ; v6(20.575,13.15) 22.125,13.4 25.15,15.7 25.3,15.85 v7(25.275,16.1)
  other v2: 15.925,8.525 20.575,13.15
FPGA-TMS: R4.12 U1.W9 | length 22
  Top Layer w0.076: U1.W9@24.825,15.975 U1.W9@24.825,16
  L4-SIG w0.076: v6(15.075,7.925) 17.375,8.725 18.575,8.725 19.05,8.95 20.775,10.675 20.8,10.675 20.825,10.7 21.325,10.7 21.9,11.275 21.9,11.3 21.925,11.325 21.925,11.35 21.95,11.375 21.95,11.4 21.975,11.425 21.975,11.45 22,11.475 22,11.5 22.025,11.525 22.025,11.55 22.05,11.575 22.05,11.6 22.075,11.625 22.1,11.675 22.1,11.725 22.125,11.75 22.125,11.8 22.15,11.825 22.15,11.85 22.175,11.875 22.2,11.925 22.2,11.95 22.225,11.975 22.225,12.025 22.25,12.05 22.25,12.425 23.675,13.85 23.925,13.85 v6(24.45,13.775)
  Bottom Layer w0.076: R4.12@12.1,5.95 11.825,6.55 11.825,7.075 11.925,7.175 11.925,7.8 12,7.875 13.875,7.875 13.925,7.925 v6(15.075,7.925) ; v6(24.45,13.775) 24.45,13.825 26.1,15.475 26.1,15.875 25.95,16.025 25.95,16.375 25.775,16.55 25.525,16.55 25.447,16.472 ; v6(24.85,16) 24.975,16.225 25.15,16.4 25.375,16.4 25.45,16.475
  other v1: 24.85,16
  other v2: 15.075,7.925 24.45,13.775 24.85,16
  other v4: 24.85,16
  other v8: 24.85,16
FT-PWREN#: U1.P19 U2.60 | length 8.1
  Top Layer w0.076: U2.60@12.05,12.1 12.175,12.25 12.25,12.325 17.525,12.325 17.55,12.35 U1.P19@19.825,13.375
FT-REF: R18.2 U2.6 | length 4.9
  Top Layer w0.076: U2.6@9.55,8.575 v7(9.575,8.575)
  Bottom Layer w0.076: v7(9.575,8.575) 9.525,7.8 9.525,5.1 9.75,4.875 9.775,4.775 9.8,4.75 9.8,4.375 10.125,4.05 R18.2@10.15,3.975
FT-RESETN: R19.1 U2.14 | length 8.3
  Top Layer w0.076: U2.14@9.55,4.55 9.575,4.55 9.975,4.15 v3(9.975,4.1)
  L3-SIG w0.076: v3(9.975,4.1) v1(11.95,4.1)
  L4-SIG w0.076: v1(11.95,4.1) 12.225,3.825 14.325,3.825 v6(14.725,3.425)
  Bottom Layer w0.076: v6(14.725,3.425) 15.15,3 16.675,3 16.725,2.975 16.75,2.95 16.875,2.95 16.975,2.85 R19.1@17.15,2.775
  other v2: 14.725,3.425
  other v5: 9.975,4.1
FT-VCORE: C139.2 C152.2 C153.2 C154.2 U2.12 U2.37 U2.49 U2.64 | length 22.8
  Top Layer w0.15: U2.12@9.55,5.55 9.65,5.525 11.075,4.425 v3(11.8,3.725) ; U2.12@9.55,5.75 v3(9.675,5.75) ; v3(9.925,11.5) U2.64@9.925,11.525 ; v7(17.5,8.425) U2.49@17.5,11.525
  L3-SIG w0.15: v3(9.675,5.75) 9.7,7.05 9.725,7.075 9.725,7.1 9.925,7.3 v3(9.925,11.5) ; v1(15.775,2.9) v3(17.85,5.55) ; v1(18.075,7.225) 18.075,6.65 18.1,6.625 18.1,6.6 18.2,6.5 v3(18.2,5.75)
  L4-SIG w0.15: v3(11.8,3.725) v6(12.35,3.475) ; v6(13.125,2.675) v6(14.15,2.675) ; v6(14.5,2.9) v6(15.35,2.7) v1(15.775,2.9) ; v6(15.675,2.475) 15.825,2.475 16.025,2.675 16.05,2.675 16.075,2.7 v9(16.475,2.7) ; v7(17.5,8.425) 17.525,7.95 17.55,7.925 17.55,7.9 18.075,7.375 v1(18.075,7.225)
  Bottom Layer w0.15: v6(12.35,3.475) C139.2@12.55,3.375 ; C139.2@13.1,2.675 v6(13.125,2.675) ; C152.2@14.375,2.775 v6(14.5,2.9) ; C153.2@15.575,2.55 v6(15.675,2.475) ; v9(16.475,2.7) C154.2@16.575,2.7
  other v1: 11.8,3.725
  other v2: 15.675,2.475 13.125,2.675 14.15,2.675 15.35,2.7 14.5,2.9 12.35,3.475
  other v5: 11.8,3.725 17.85,5.55 9.675,5.75 18.2,5.75 9.925,11.5
  other v10: 16.475,2.7
FT-VPHY: C40.2 L4.1 U2.4 | length 11.2
  L3-SIG w0.15: v3(9.05,9.55) 9.075,8.5 9.075,8.425 9.1,8.4 9.1,8.325 9.125,8.3 9.125,8.25 9.15,8.225 9.175,8.125 9.2,8.025 9.2,8 9.3,7.9 9.3,7.875 9.325,7.85 v1(9.375,4.5)
  L4-SIG w0.15: v6(9.375,2.775) v1(9.375,4.5) ; v6(9.675,2.5) 9.85,2.5 10.025,2.675 10.05,2.675 10.075,2.7 10.925,2.7 11.2,2.975 11.225,2.975 11.25,3 v6(13.675,3.275)
  Bottom Layer w0.15: C40.2@9.575,2.55 v6(9.675,2.5)
  other v2: 9.675,2.5 9.375,2.775 13.675,3.275
  other v5: 9.05,9.55
FT-VPLL: C41.2 L5.1 U2.9 | length 12.7
  L3-SIG w0.15: v3(9,7.05) 9,4.925 8.7,4.625 8.7,4.6 8.675,4.575 8.675,4.55 8.65,4.525 8.65,4.425 8.675,4.4 8.675,4.375 8.7,4.35 8.7,4.325 9.475,3.55 9.475,2.975 9.5,2.95 9.5,2.925 9.675,2.75 9.7,2.75 9.725,2.725 10.3,2.725 v7(10.675,2.35) 11.025,2.775 11.05,2.8 11.05,2.825 11.2,2.975 11.225,2.975 11.25,3 11.75,3 11.9,2.85 11.925,2.85 11.95,2.825 15.175,2.825 v1(15.6,3.25)
  L4-SIG w0.15: v1(15.6,3.25) v6(16.575,3.3)
  Bottom Layer w0.15: v7(10.675,2.35) C41.2@10.675,2.55
  other v2: 16.575,3.3
  other v5: 9,7.05
GND: C3.1 C4.1 C5.1 C6.1 C7.1 C8.1 C9.1 C11.1 C12.1 C13.1 C38.1 C40.1 C41.1 C78.1 C80.1 C82.1 C84.1 C85.2 C86.2 C87.2 C88.2 C89.2 C90.2 C91.2 C92.2 C93.2 C94.2 C95.2 C96.2 C97.2 C98.2 C99.2 C100.2 C101.2 C102.2 C103.2 C104.2 C105.2 C106.2 C107.2 C108.2 C109.2 C110.2 C111.2 C112.2 C113.2 C114.2 C115.2 C116.2 C117.2 C118.2 C119.2 C120.2 C121.2 C122.2 C133.1 C134.1 C135.1 C136.1 C137.1 C138.1 C139.1 C140.2 C141.2 C142.2 C143.2 C144.2 C145.2 C146.2 C147.1 C148.1 C149.1 C150.1 C151.1 C152.1 C153.1 C154.1 C155.1 C156.1 C157.1 C158.1 C159.1 JP3.3 L6.1 LD1.K LD2.K Q1.2 R5.1 R11.1 R13.2 R15.1 R17.2 R18.1 R21.1 R22.1 R27.1 R28.1 R78.1 R86.1 R102.1 R103.1 R104.1 R105.1 R106.1 RESET.3 RESET.4 U1.A1 U1.A3 U1.A4 U1.A5 U1.A6 U1.A7 U1.A9 U1.A11 U1.A19 U1.B1 U1.B3 U1.B4 U1.B5 U1.B6 U1.B7 U1.B9 U1.B11 U1.B14 U1.C1 U1.C2 U1.C3 U1.C4 U1.C5 U1.C6 U1.C7 U1.C10 U1.C19 U1.D3 U1.E1 U1.E2 U1.E3 U1.E17 U1.F1 U1.F2 U1.F3 U1.F19 U1.G1 U1.G7 U1.G8 U1.G9 U1.G11 U1.H7 U1.H8 U1.H9 U1.H11 U1.H12 U1.H18 U1.J8 U1.J9 U1.J11 U1.J12 U1.K8 U1.L8 U1.L9 U1.L11 U1.L19 U1.M9 U1.M13 U1.N9 U1.N12 U1.N13 U1.P2 U1.T19 U1.U6 U1.U9 U1.V18 U1.W1 U1.W12 U2.1 U2.5 U2.10 U2.11 U2.13 U2.15 U2.25 U2.35 U2.47 U2.51 U3.A1 U3.A3 U3.B7 U3.C3 U3.D7 U3.E3 U3.J1 U4.4 U5.2 U6.2 U7.2 U8.4 U8.6 U8.8 U8.17 U10.5 X1.5 X1.MH2 X1.MP1 X1.MP2 X1.MP3 X1.MP4 X2.4 X3.6 X3.G1 X3.G2 X3.G3 X3.G4 X4.2 X5.1 X5.MP1 X5.MP2 | length 19.4
  L3-SIG w0.076: v7(35.6,15.175) 35.75,14.95 35.775,14.9 v6(36.175,14.35)
  L4-SIG w0.076: v6(22.3,13.9) v7(22.775,13.5) ; v1(26.7,13.35) 26.7,13.575 v6(26.7,14.3) ; v6(35.05,6.85) v7(35.475,6.275)
  Bottom Layer w0.076: v7(0.675,12.25) R105.1@0.675,12.275 ; v7(0.7,4.375) C151.1@0.7,4.4 ; v7(0.725,10.6) U8.4@0.725,10.625 ; v7(1.7,9.275) U8.17@1.7,9.3 ; v7(2.025,11.1) U8.6@2.025,11.125 ; v7(3.025,11.1) U8.8@3.025,11.125 ; v7(3.05,13.35) R106.1@3.05,13.375 ; v7(3.2,16.975) C78.1@3.2,17 ; v7(4.65,9.45) R102.1@4.65,9.475 ; v7(4.65,10.75) R103.1@4.65,10.775 ; v7(4.65,12.05) R104.1@4.65,12.075 ; C150.1@5.25,5.025 v7(5.275,5.025) ; v7(8.75,2.525) C40.1@8.75,2.55 ; v7(8.875,3.225) R18.1@8.875,3.275 ; v7(8.9,13.25) C148.1@9,13.25 ; v7(9,17.225) C147.1@9,17.25 ; v7(9.4,9.225) C149.1@9.4,9.25 ; v7(10.175,2.35) C41.1@10.175,2.55 ; v7(11.575,15.4) U6.2@11.575,15.425 ; v7(11.575,19.4) U5.2@11.575,19.425 ; U7.2@11.675,12.275 v7(11.675,12.45) ; C139.1@11.8,2.675 v7(11.825,2.325) ; v7(13.55,2.325) C152.1@13.55,2.55 ; v7(14.725,2.35) C153.1@14.75,2.55 ; v7(16.075,6.875) C100.2@16.075,6.9 ; v7(16.125,10.925) C85.2@16.125,10.95 ; v7(16.125,17.225) C80.1@16.125,17.25 ; v7(16.175,2.35) C154.1@16.175,2.55 ; v7(16.725,14.925) C93.2@16.725,14.95 ; v7(17.475,7.275) JP3.3@17.475,7.3 ; v7(17.875,14.925) C144.2@17.875,14.95 ; v7(17.875,18.925) C97.2@17.875,18.95 ; v7(18.75,10.925) C86.2@18.75,10.95 ; v7(19.35,2.525) C155.1@19.35,2.55 ; v7(20.575,2.3) C156.1@20.575,2.55 ; v7(21.15,16.25) C110.2@21.275,15.775 ; v7(21.2,4.675) C94.2@21.2,4.7 ; v7(21.275,8.75) C95.2@21.275,8.775 ; v7(21.275,12.15) C91.2@21.275,12.175 ; v7(21.775,2.525) C157.1@21.775,2.55 ; v7(21.9,3.275) C87.2@21.9,3.3 ; v6(22.3,13.9) 22.35,13.95 22.35,14.275 23.15,15.075 C107.2@23.5,15.575 ; v7(22.775,13.5) 23.55,14.275 23.575,14.275 23.65,14.35 23.675,14.35 23.75,14.425 23.775,14.425 23.85,14.5 23.875,14.5 23.95,14.575 23.975,14.575 24.05,14.65 24.075,14.65 24.175,14.75 24.2,14.75 24.275,14.825 24.3,14.825 24.375,14.9 24.4,14.9 24.475,14.975 24.5,14.975 24.575,15.05 24.6,15.05 24.675,15.125 24.7,15.125 24.8,15.225 24.825,15.225 24.9,15.3 24.925,15.3 25,15.375 25.025,15.375 25.1,15.45 25.125,15.45 25.2,15.525 25.225,15.525 25.325,15.625 C109.2@25.725,15.625 ; v7(22.95,2.525) C158.1@22.95,2.55 ; C89.2@23.725,12.175 v7(23.8,11.55) ; v7(24.15,2.525) C159.1@24.15,2.55 ; v7(24.4,3.275) C88.2@24.4,3.3 ; v7(24.4,4.675) C99.2@24.4,4.7 ; v7(24.95,18.95) C133.1@24.95,18.975 ; v7(24.95,19.55) C135.1@24.95,19.575 ; v7(25.1,8.75) C92.2@25.1,8.775 ; v7(25.35,2.525) C38.1@25.35,2.55 ; v7(25.575,18.325) C121.2@25.575,18.35 ; v7(25.725,8.75) C96.2@25.725,8.775 ; v7(25.75,17) C111.2@25.75,17.15 ; v7(25.75,17.625) C117.2@25.75,17.775 ; v7(25.9,4.075) C82.1@25.9,4.1 ; C90.2@25.925,12.375 v7(26.25,12.7) ; v7(26.15,19.625) C137.1@26.15,19.65 ; v7(26.7,2.675) C84.1@26.7,2.7 ; v6(26.7,14.3) C113.2@28.05,15.68 ; C114.2@26.975,17.375 v6(27.025,17.45) ; v7(27.35,19.625) C138.1@27.35,19.65 ; v7(27.55,12.175) C108.2@27.95,12.175 ; v7(27.575,8.7) C112.2@27.95,8.775 ; C115.2@27.95,17.375 v7(27.95,17.75) C119.2@27.95,17.775 ; v7(28.575,18.95) C134.1@28.575,18.975 ; v7(28.575,19.55) C136.1@28.575,19.575 ; C116.2@29.15,17.375 v7(29.15,17.75) C120.2@29.15,17.775 ; v7(29.15,18.325) C122.2@29.15,18.35 ; C9.1@30.3,7.575 v7(30.3,8.175) C13.1@30.3,8.2 ; C8.1@31.55,10.5 v7(32,10.475) C7.1@32,10.5 ; v7(32,2.675) C101.2@32,2.7 ; v7(32,4.075) C103.2@32,4.1 ; v7(32,5.475) C105.2@32,5.5 ; v7(32.075,13.425) C141.2@32.1,13.425 ; v7(32.1,15.175) C143.2@32.1,15.2 ; v7(32.675,6.85) C11.1@32.675,6.875 ; C145.2@33.1,17.75 v7(33.125,17.75) ; v7(33.15,10.475) C6.1@33.15,10.5 ; v7(34.3,10.475) C5.1@34.3,10.5 ; v6(35.05,6.85) C12.1@35.05,6.875 ; v7(35.2,2.675) C102.2@35.2,2.7 ; v7(35.2,4.075) C104.2@35.2,4.1 ; v7(35.2,5.475) C106.2@35.2,5.5 ; v7(35.275,8.625) C140.2@35.3,8.625 ; v7(35.45,10.475) C4.1@35.45,10.5 ; v7(35.575,17.85) C146.2@35.6,17.85 ; v7(35.6,15.175) C98.2@35.6,15.2 ; C142.2@36.175,14.3 36.175,14.325 v6(36.175,14.35) ; v7(36.6,10.475) C3.1@36.6,10.5 ; v7(37.975,16.45) X3.G4@37.975,16.475 ; v7(38.625,8.8) X3.6@38.625,8.825 ; X3.G1@39.15,5.875 v7(39.175,5.875) ; v7(45.575,5.125) X3.G2@45.575,5.15 ; v7(46.275,17.075) X3.G3@46.275,17.1
  other v1: 36.175,14.35 27.025,17.45 26.95,17.925
  other v2: 35.05,6.85 22.3,13.9 26.7,14.3 36.175,14.35 27.025,17.45 26.95,17.925
  other v3: 7.15,2.55 13.85,2.675 7.15,3.15 21.475,3.225 25.625,3.225 9,4.05 30.85,4.325 34.05,4.325 17.85,4.55 9,5.05 31.375,5.95 9,6.05 9,6.55 31.775,8.075 38.175,8.075 9,9.05 31.775,9.675 33.375,9.675 34.975,9.675 17.85,10.55 9,11.05 16.35,11.525 48.9,12.025 13.675,12.65 32.575,12.875 34.175,12.875 41.05,13.5 9.225,14.4 7.125,14.45 35.75,16.775 38.75,16.775 18.775,16.85 21.775,16.85 11.425,16.925 17.575,17.35 34.55,17.35 37.075,17.475
  other v4: 18.975,2.675 50.125,6.425 19.9,6.93 23.9,6.93 24.9,6.93 25.9,6.93 26.4,6.93 26.9,6.93 27.4,6.93 27.9,6.93 28.9,6.93 22.4,7.43 23.9,7.43 24.9,7.43 25.9,7.43 26.4,7.43 26.9,7.43 27.4,7.43 27.9,7.43 28.9,7.43 19.9,7.93 24.4,7.93 25.9,7.93 26.4,7.93 26.9,7.93 27.4,7.93 27.9,7.93 28.4,7.93 28.9,7.93 7.575,7.95 45.575,7.975 27.9,8.43 20.9,8.93 27.9,8.93 28.4,8.93 28.9,8.93 19.9,9.43 27.9,9.43 28.4,9.43 28.9,9.43 23.9,9.93 24.9,9.93 25.4,9.93 25.9,9.93 28.9,9.93 20.4,10.43 23.4,10.43 23.9,10.43 24.9,10.43 25.4,10.43 25.9,10.43 23.4,10.93 23.9,10.93 24.9,10.93 25.4,10.93 25.4,11.43 19.9,11.93 23.9,11.93 24.9,11.93 25.4,11.93 22.9,12.43 24.9,12.43 22.9,12.93 23.4,12.93 24.9,12.93 28.4,13.43 19.9,14.43 24.9,14.93 26.4,14.93 20.4,15.43 23.4,15.93 28.9,15.93
  other v6: 26.95,17.925
  other v7: 2.335,9.235 2.56,10.16 11.975,15.6 11.975,19.6
  other v8: 26.7,13.35 27.025,17.45 26.95,17.925
GNDADC: C123.2 C124.2 L6.2 U1.A12 U1.A13 U1.B12 U1.B13 U1.C12 | length 39.6
  Top Layer w0.15: v3(22.675,19.35) 24.275,19.35 24.8,19.875 24.825,19.875 24.85,19.9 25.4,19.9 26,19.3 26.025,19.3 26.05,19.275 v4(27.925,18.925) ; U1.A13@22.875,7.025 U1.B13@22.875,7.35 ; U1.A13@22.925,7.025 U1.A13@22.95,7.025 ; U1.B13@22.975,7.375 U1.B12@23.325,7.375 ; U1.A12@23.375,7.025 U1.B12@23.375,7.35 ; U1.B12@23.375,7.525 U1.C12@23.375,7.85 ; v7(38.175,18.3) 38.425,18.3 38.45,18.275 38.475,18.275 38.5,18.25 38.525,18.25 38.55,18.225 38.575,18.225 38.6,18.2 38.625,18.2 38.65,18.175 L6.2@38.675,18.175
  L3-SIG w0.15: v1(18.275,8.45) 18.275,10.7 18.25,10.725 18.25,10.75 18.225,10.775 18.225,12.2 18.175,12.25 18.175,12.275 18.15,12.3 18.15,12.325 18.125,12.35 18.125,14.2 17.55,14.775 17.55,14.8 17.525,14.825 17.525,15.9 17.55,15.925 17.55,15.95 17.825,16.225 17.825,16.875 17.85,16.9 17.85,16.925 18.05,17.125 18.05,17.45 18.075,17.475 18.075,17.5 18.225,17.65 18.25,17.65 18.275,17.675 19.05,17.675 19.325,17.95 19.35,17.95 19.375,17.975 20,17.975 21.35,19.325 21.375,19.325 21.4,19.35 v3(22.675,19.35) ; v1(31.95,19.575) 32.4,19.825 32.975,19.825 33,19.85 33.025,19.85 33.05,19.875 35.125,19.8 v1(36.2,19.3)
  L4-SIG w0.15: v1(18.275,8.45) 19.45,8.45 20.25,7.65 20.275,7.65 20.3,7.625 v6(21.4,6.95) ; v1@23.4,7.925 v6(23.625,8.25) ; v6(28.175,18.6) 28.95,18.6 29,18.65 29.025,18.65 29.05,18.675 v6(30,18.675) ; v6(31.125,19.175) 31.3,19.175 31.325,19.2 31.35,19.2 31.375,19.225 31.4,19.225 31.425,19.25 31.45,19.25 31.475,19.275 31.5,19.275 31.525,19.3 31.55,19.3 31.575,19.325 31.6,19.325 31.625,19.35 31.65,19.35 31.675,19.375 31.7,19.375 31.725,19.4 31.75,19.4 31.775,19.425 31.8,19.425 v1(31.95,19.575) ; v1(36.2,19.3) v7(38.175,18.3)
  Bottom Layer w0.15: v6(21.4,6.95) v7@22.95,7.025 ; v6(23.625,8.25) C123.2@23.85,8.775 ; C124.2@28.1,18.6 v6(28.175,18.6) ; v6(30,18.675) 30.05,18.675 30.175,18.8 30.2,18.8 30.225,18.825 v6(31.125,19.175)
  other v1: 23.4,7.93 27.925,18.925
  other v2: 21.4,6.95 23.625,8.25 28.175,18.6 30,18.675 27.925,18.925 31.125,19.175
  other v4: 23.4,7.93
  other v5: 22.675,19.35
  other v6: 27.925,18.925
  other v7: 23.03,7.121
  other v8: 23.4,7.93 27.925,18.925
LD5_K: LD5.K R78.2 | length 1
  L3-SIG w0.076: v3(29.95,5.025) v3(30.175,5.95)
  other v5: 29.95,5.025 30.175,5.95